# Altium PCB TimeCounter.PcbDoc
Units mil, origin at the board's own origin, x right, y up, seen from the top; angles counter-clockwise.
Board outline 2645.67 x 2677.01 mil, 4 copper layers (Top Layer, GND, PWR, Bottom Layer), stack 62.778 mil thick; 32 components, 21 nets, 141 pads, 58 vias.
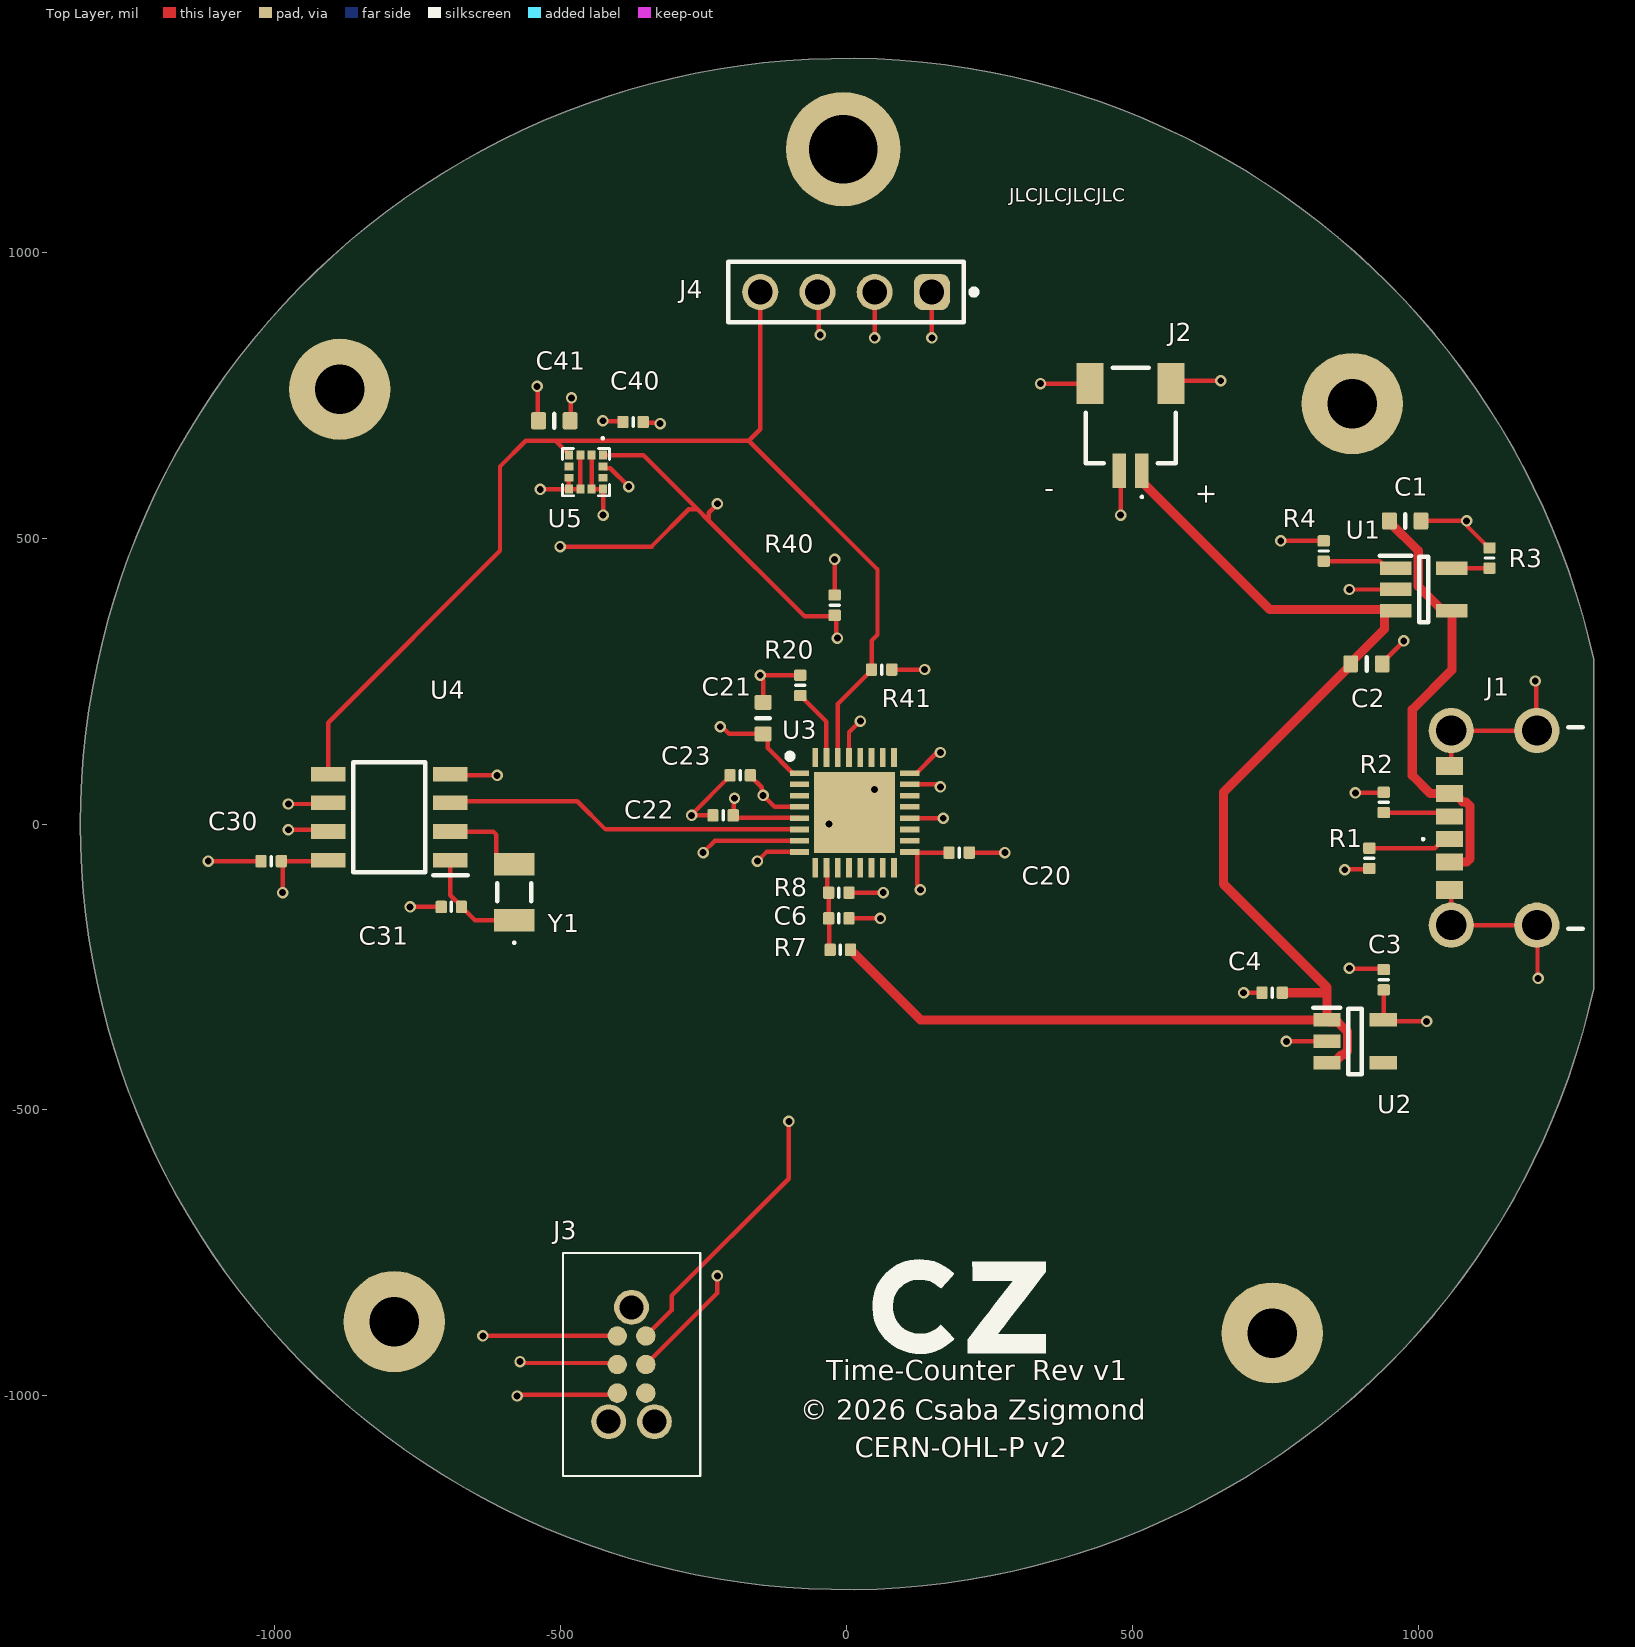
[diagram p0: Top Layer view]
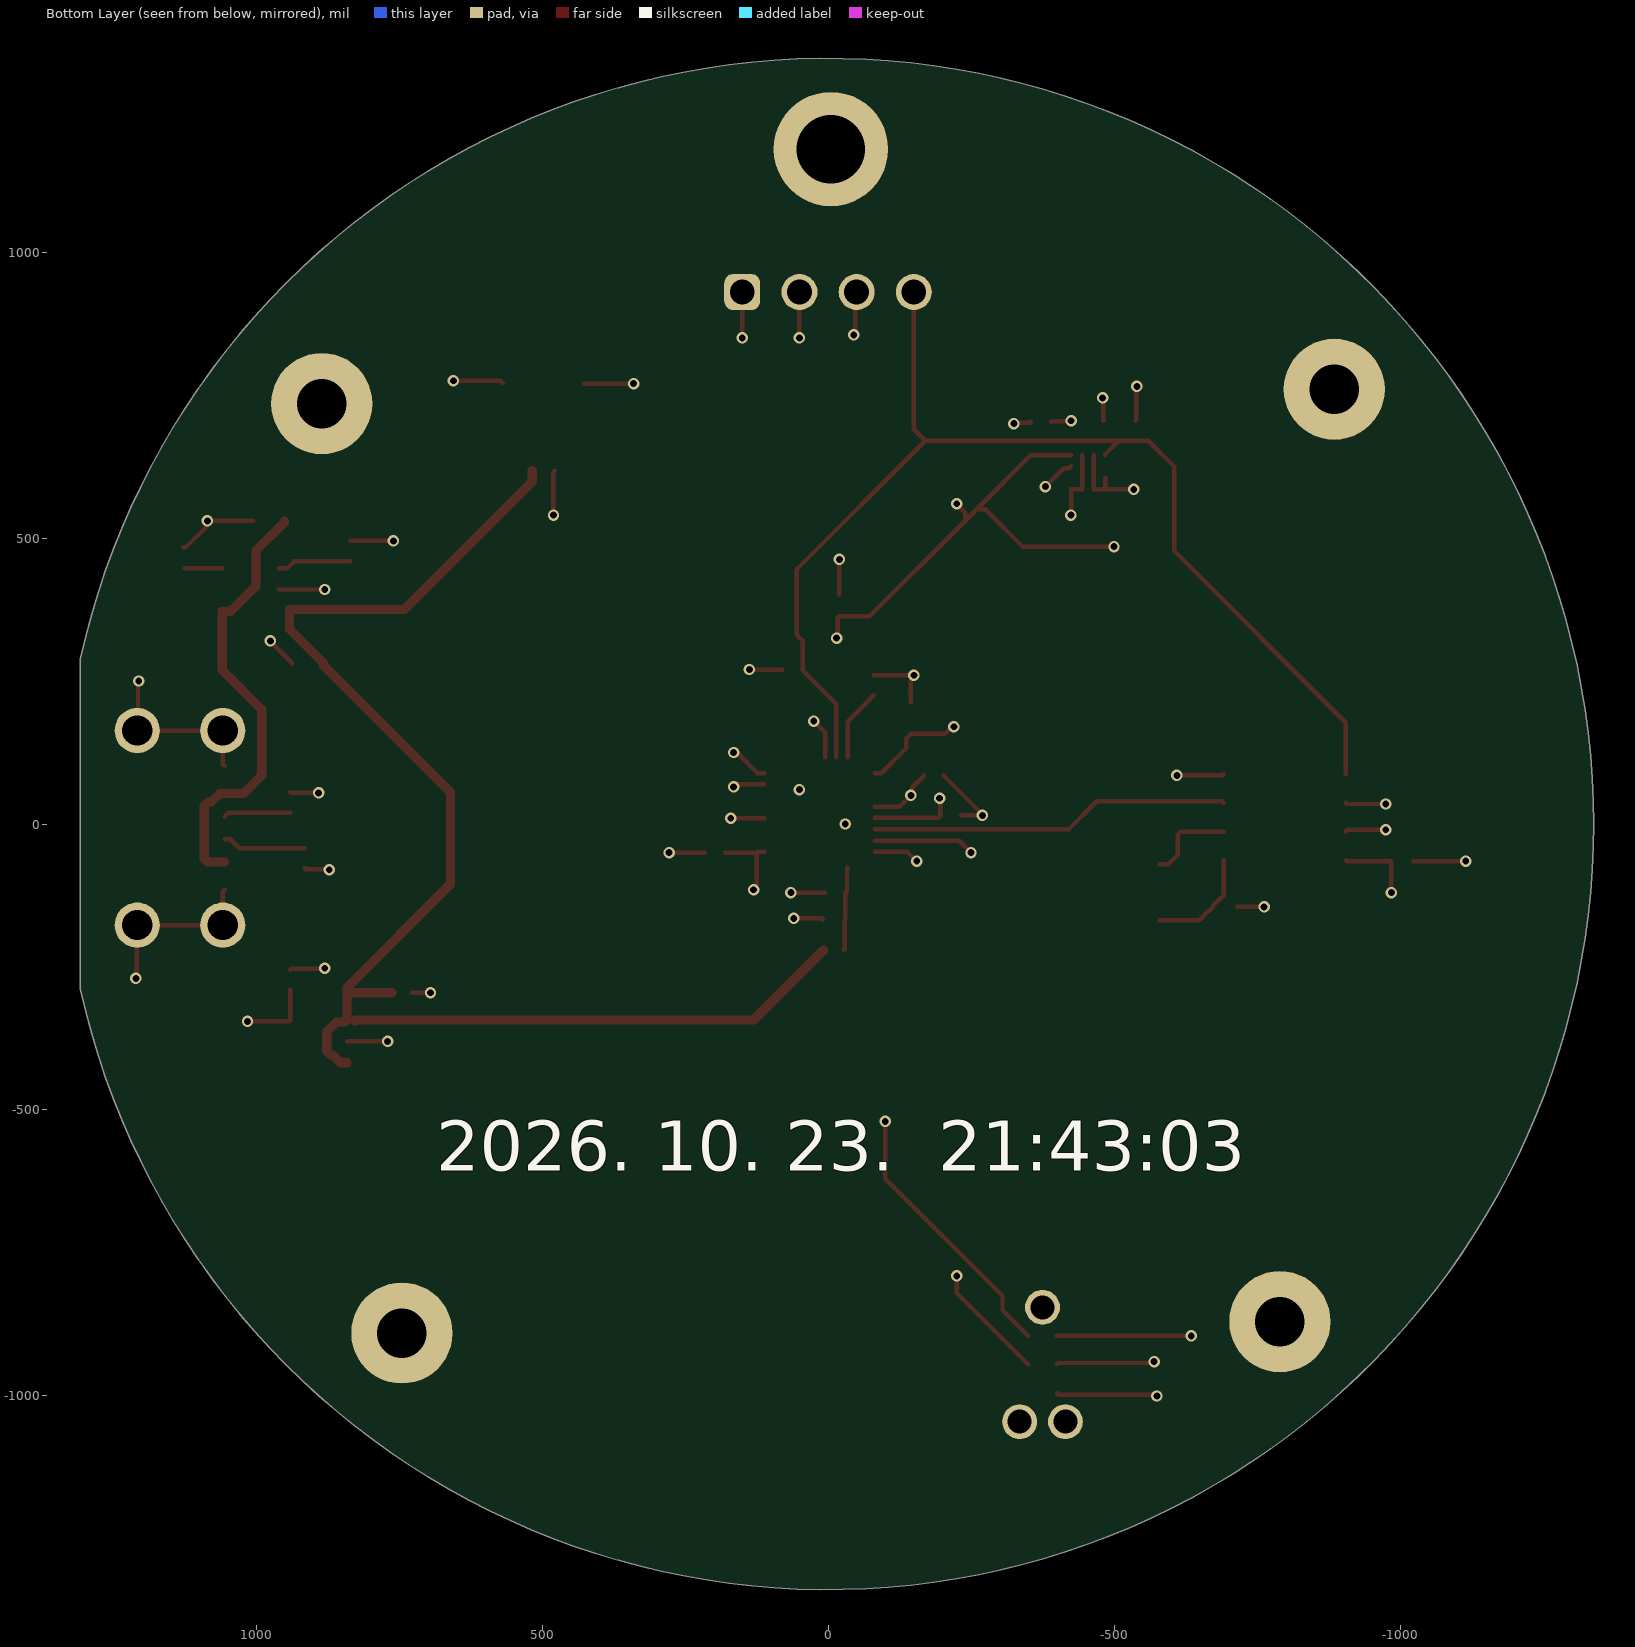
[diagram p1: Bottom Layer view, seen from below]
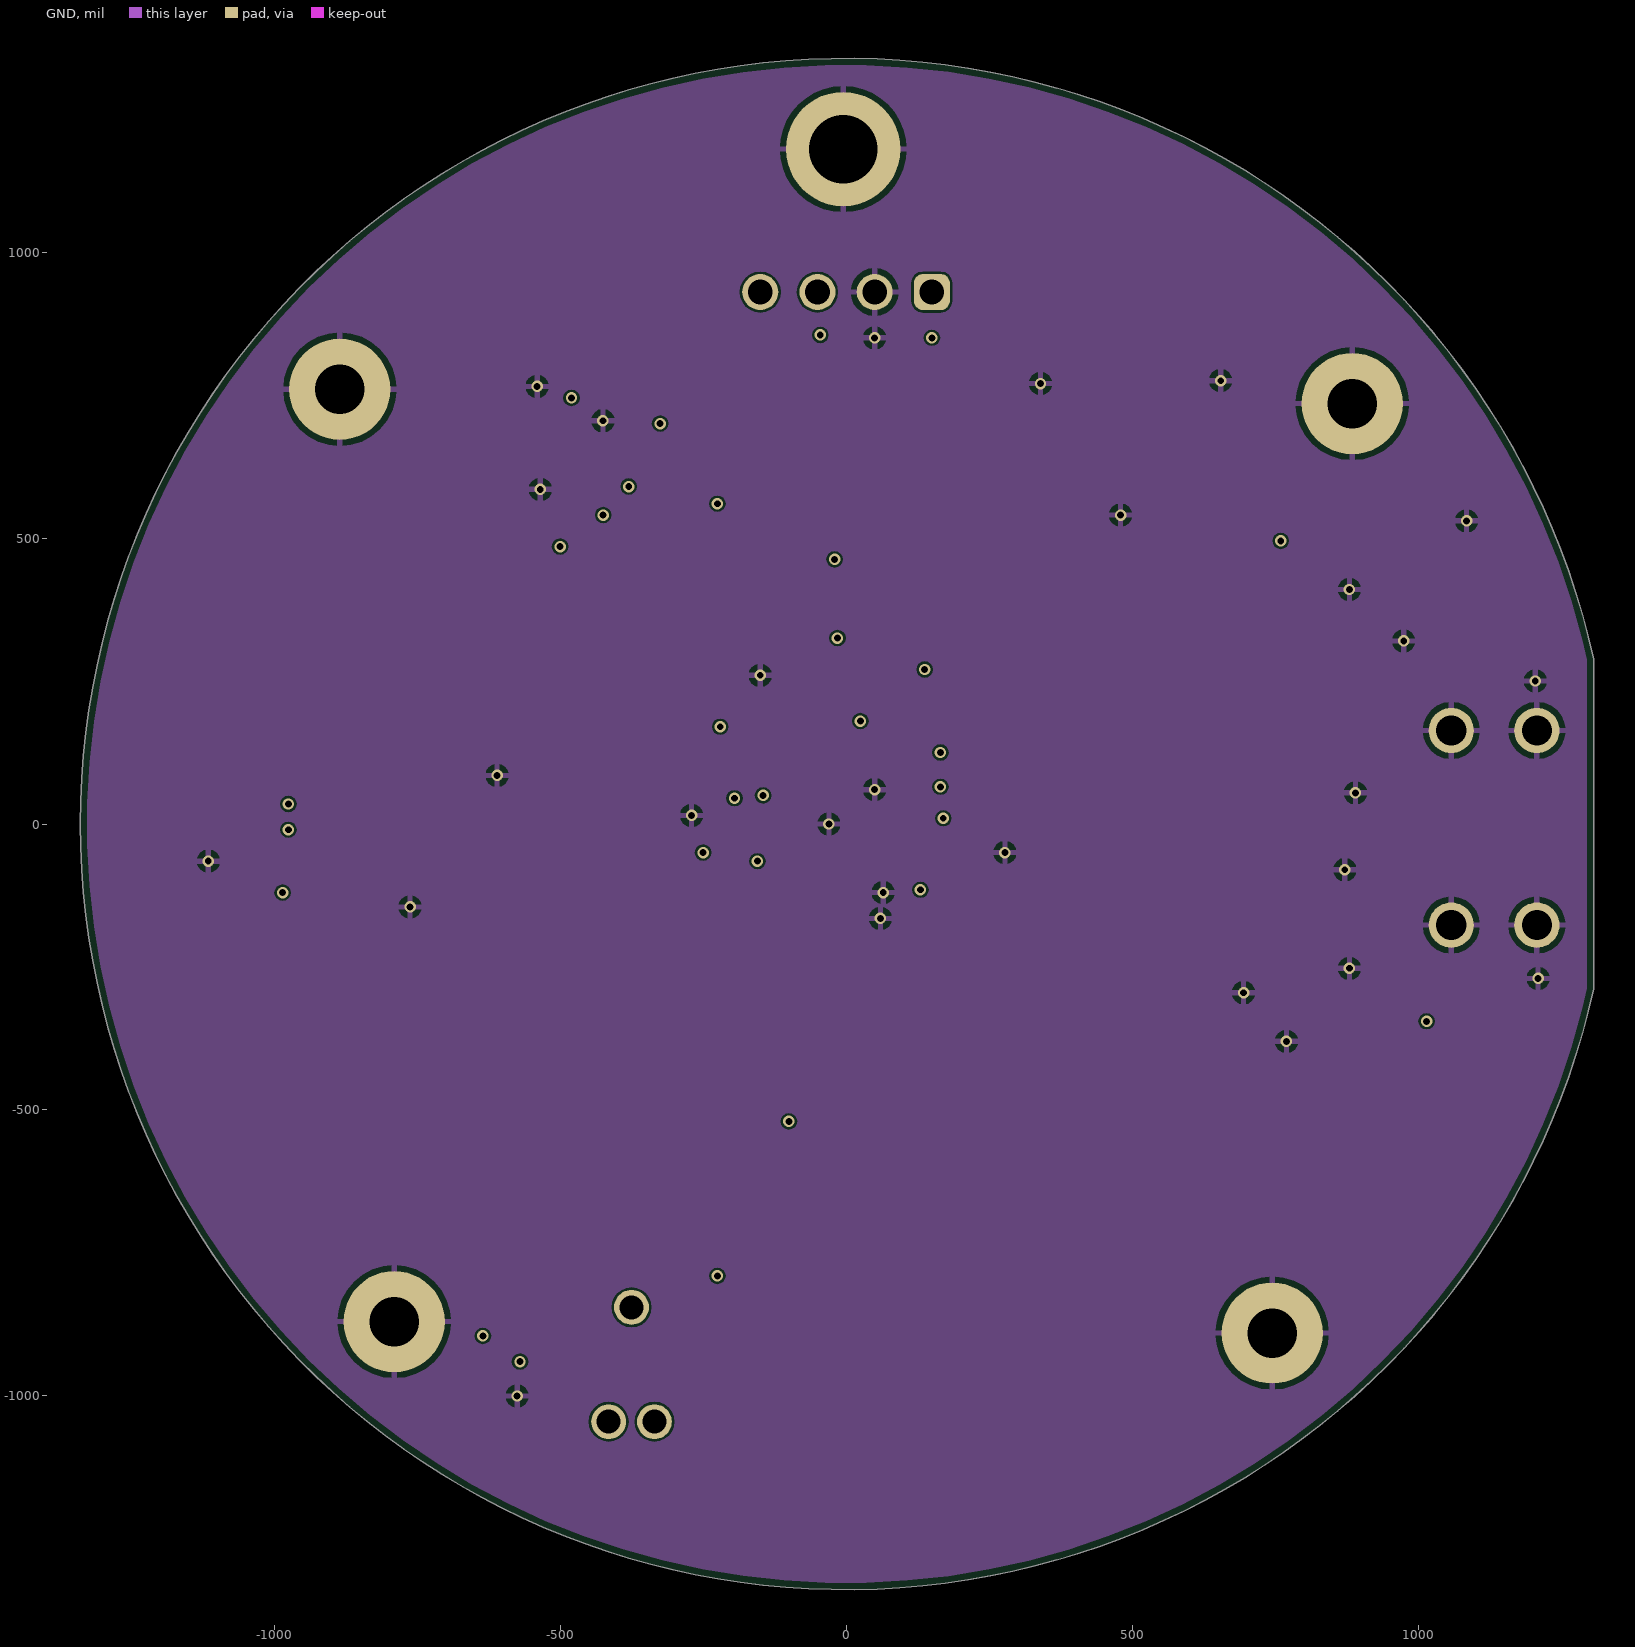
[diagram p2: GND]
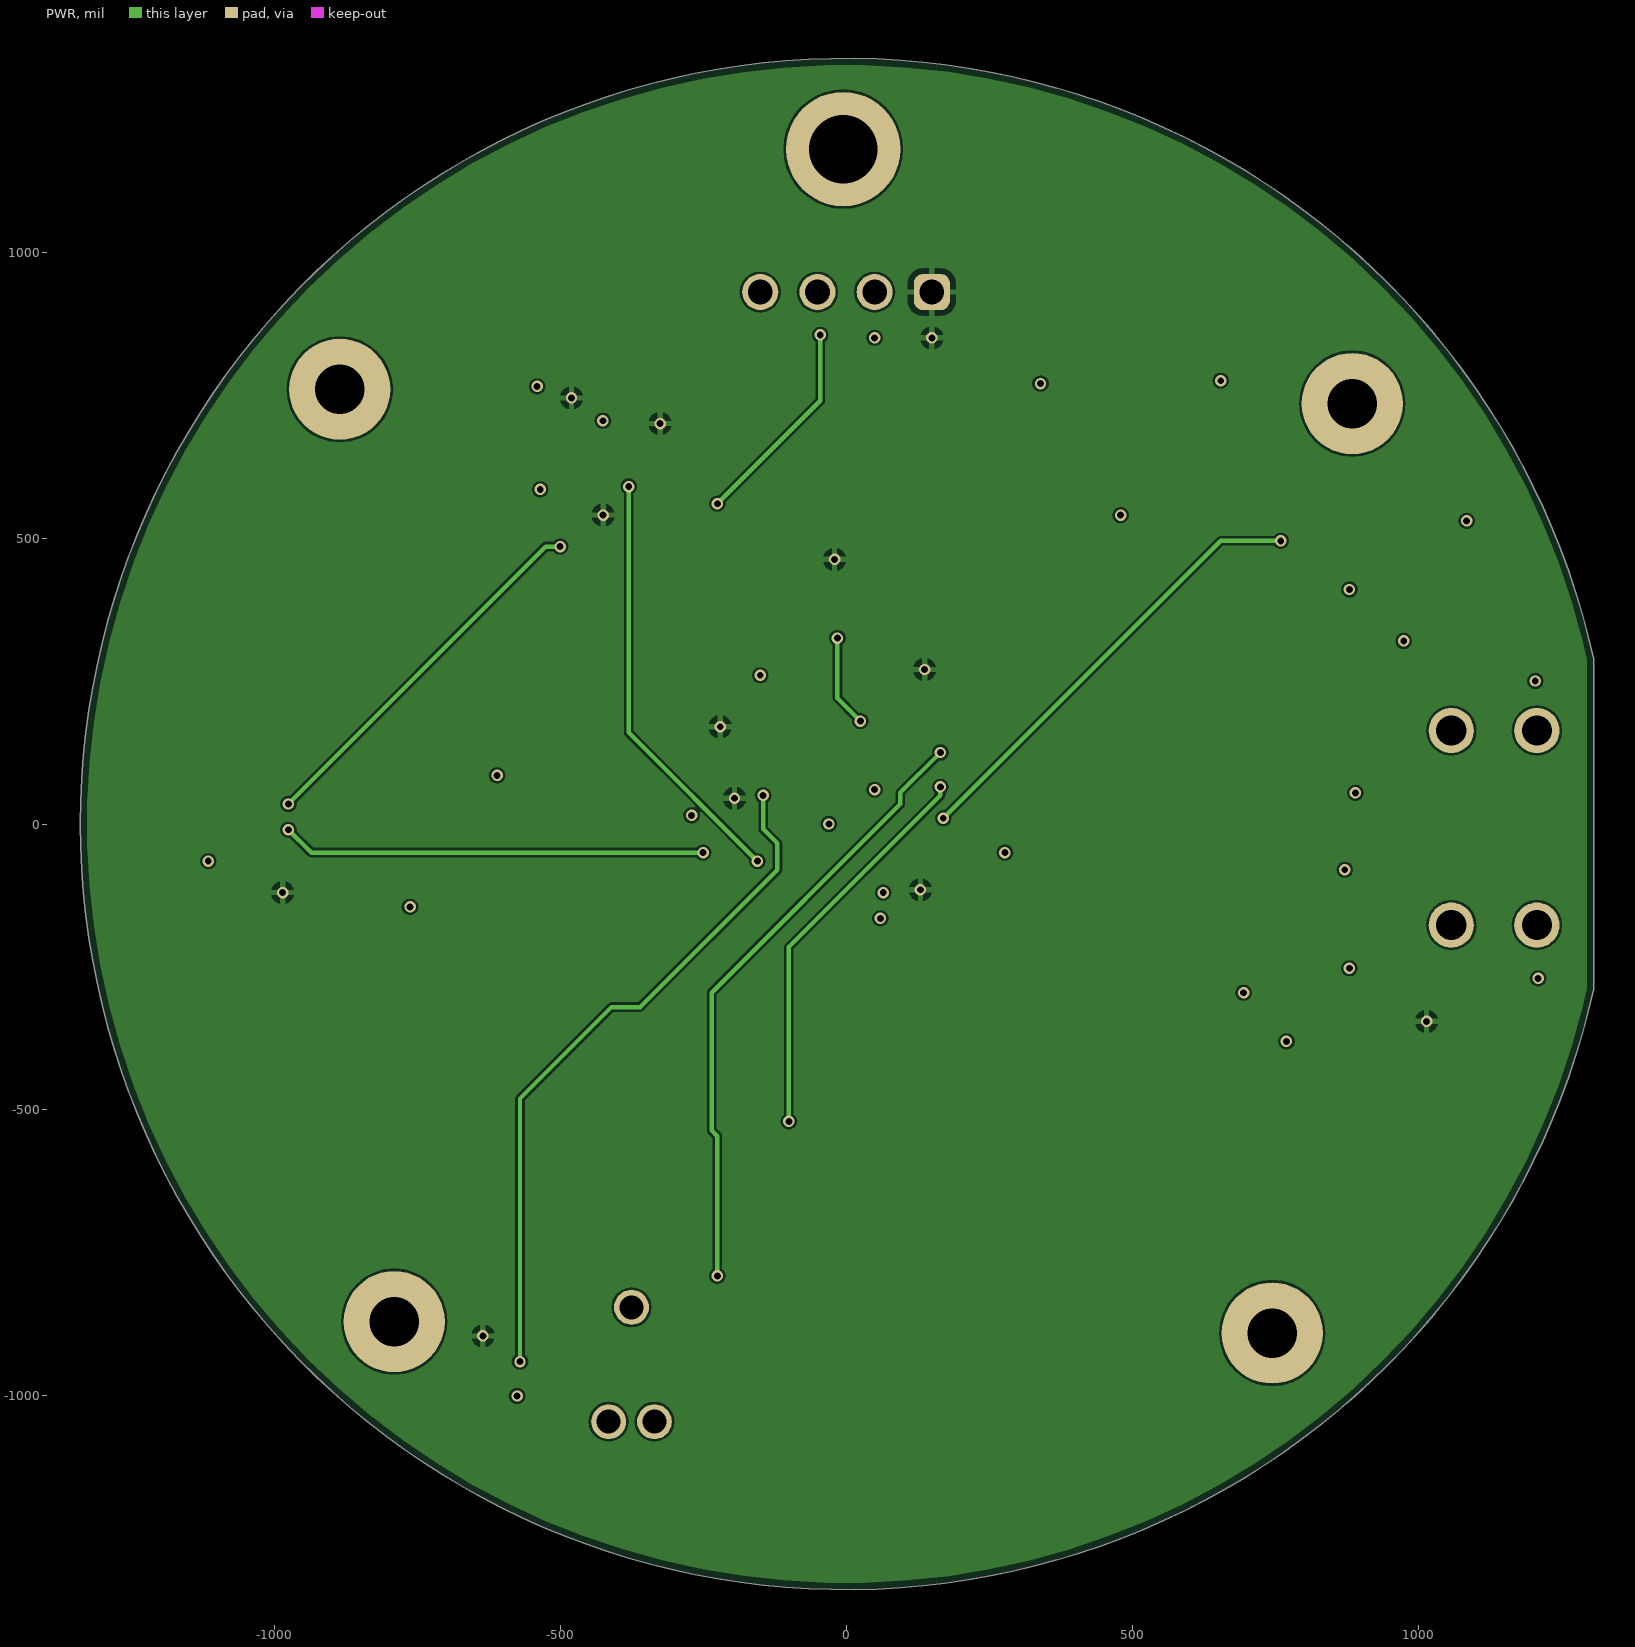
[diagram p3: PWR]

## Layer stack, top to bottom
Top Solder: solder mask 0.4, Solder Resist, Dk 3.5
Top Layer: signal copper 1.4
Dielectric 2: prepreg 8.3, PP-006, Dk 4.1
GND: signal copper 0.689
Dielectric 1: dielectric 42, FR-4, Dk 4.8
PWR: signal copper 0.689
Dielectric 3: prepreg 8.3, PP-006, Dk 4.1
Bottom Layer: signal copper 1.4
Bottom Solder: solder mask 0.4, Solder Resist, Dk 3.5

## Board outline
1307.09,-288.67 cw(c0,0) 1307.09,288.67 1307.09,288.66

## Design rules (kind name [scope] priority, off if disabled: settings)
BoardOutlineClearance [All] p1: gap=12 ignorepadtopadclearanceinfootprint=FALSE
Clearance [All] p1: gap=4 ignorepadtopadclearanceinfootprint=FALSE
ComponentClearance [All] p1: gap=8 collisioncheckmode=3 verticalgap=10 showdistances=FALSE
HoleSize [All] p1: absolutevalues=TRUE maxlimit=248 minlimit=8 maxpercent=80.000 minpercent=20.000
MinimumSolderMaskSliver [All] p1: minsoldermaskwidth=4
PolygonConnect [All] p1: connectstyle=Relief reliefconductorwidth=10 reliefentries=4 polygonreliefangle="90 Angle" airgapwidth=10
RoutingLayers [All] p1: top layer_v5=TRUE mid layer 1_v5=FALSE mid layer 2_v5=TRUE bottom layer_v5=FALSE
RoutingVias [All] p1: holewidth=12 width=20 viastyle="Through Hole" minholewidth=12 minwidth=20 maxholewidth=28 maxwidth=50
SilkToSilkClearance [All] p1: silktosilkclearance=6
SilkToSolderMaskClearance [IsText Or IsRegion] p1: minsilkscreentomaskgap=10 clearancetoexposedcopper=FALSE
SolderMaskExpansion [All] p1: expansion=0 istentingtop=FALSE
SupplyNets "Schematic Supply Nets_3" [InNet('3V3')] p1: voltage=0.000
SupplyNets "Schematic Supply Nets_2" [InNet('VBUS')] p2: voltage=0.000
SupplyNets "Schematic Supply Nets_1" [InNet('VBAT')] p3: voltage=0.000
SupplyNets "Schematic Supply Nets" [InNet('GND')] p4: voltage=0.000
Width Power [InNet('VBUS') Or InNet('VBAT')] p1: maxlimit=40 minlimit=8 preferedwidth=16
Width [All] p2: maxlimit=39 minlimit=4 preferedwidth=7.8
24 further rules are at their usual default settings.

## Components (designator, comment, footprint, x,y, rotation, side; value= is the part's Value field where it differs from the comment)
C1 "Capacitor 4.7µF +/-20% 10V 0603" CAPC0603(1608)100_L 977.56,530 r0 top value=4.7µF
C2 "Capacitor 4.7µF +/-20% 10V 0603" CAPC0603(1608)100_L 910,280 r0 top value=4.7µF
C3 "Capacitor 1µF +/-20% 10V 0402" CAPC0402(1005)60_L 940,-272.28 r90 top value=1µF
C4 "Capacitor 1µF +/-20% 10V 0402" CAPC0402(1005)60_L 745,-295 r180 top value=1µF
C6 "Capacitor 100nF +/-20% 10V 0402" CAPC0402(1005)60_L -12.72,-165 r0 top value=100nF
C20 "Capacitor 100nF +/-20% 10V 0402" CAPC0402(1005)60_L 197.72,-50 r0 top value=100nF
C21 "Capacitor 4.7µF +/-20% 10V 0603" CAPC0603(1608)100_L -145,185 r90 top value=4.7µF
C22 "Capacitor 100nF +/-20% 10V 0402" CAPC0402(1005)60_L -215,15 r180 top value=100nF
C23 "Capacitor 100nF +/-20% 10V 0402" CAPC0402(1005)60_L -185,85 r180 top value=100nF
C30 "Capacitor 100nF +/-20% 10V 0402" CAPC0402(1005)60_L -1005,-65 r180 top value=100nF
C31 "20pF 50V C0G 0402" CAPC0402(1005)60_L -690,-145 r180 top value="20pf C0G"
C40 "Capacitor 100nF +/-20% 10V 0402" CAPC0402(1005)60_L -372.36,702.86 r180 top value=100nF
C41 "Capacitor 10µF +/-20% 10V 0603" CAPC0603(1608)100_L -510,705 r180 top value=10µF
J1 "USB4125-GF-A-0190" USB4125GFA0190 1176.26,-6.73 r90 top
J2 "SM02B-SRSS_TB__LF__SN_" SM02BSRSSTBLFSN 497.48,707.64 r180 top
J3 "TC2030-IDC-NL" TC2030IDCNL -375,-945 r270 top
J4 "61300411121" 61300411121 0,930 r180 top
R1 "5D6KR2J" RESC0402(1005)_L 915,-60 r270 top value=5.6k
R2 "5D6KR2J" RESC0402(1005)_L 940,37.72 r90 top value=5.6k
R3 "10KR2F" RESC0402(1005)_L 1125,465 r90 top value=10k
R4 "10KR2F" RESC0402(1005)_L 835,477.28 r90 top value=10k
R7 "Resistor 1M +/-1 % 0402 63 mW" RESC0402(1005)_L -10,-220 r180 top value=1M
R8 "Resistor 1M +/-1 % 0402 63 mW" RESC0402(1005)_L -12.72,-120 r0 top value=1M
R20 "10KR2F" RESC0402(1005)_L -80,242.28 r90 top value=10k
R40 "4D7KR2F" RESC0402(1005)_L -20,382.72 r90 top value=4.7k
R41 "4D7KR2F" RESC0402(1005)_L 62.28,270 r180 top value=4.7k
U1 "MCP73831T-2ACI_OT" SOT95P270X145-5N 1010,410 r0 top
U2 "TPS7A0233DBVR" SOT95P280X145-5N 890,-380 r0 top
U3 "STM32L031K6U6" QFN50P500X500X60-33N-D 15,20 r0 top
U4 "BM8563ESA" SOIC127P600X175-8N -798.62,11.85 r180 top
U5 "LIS2DW12TR" LGA12R50P4X4_200X200X70 -454.68,615.24 r270 top
Y1 "Q13FC13500004" Q13FC13500004FC13532768KHZ125PF -580,-119.21 r90 top

## Footprints (in the part's own frame and the unit in brackets; to place one, negate y for a bottom-side part, rotate by r counter-clockwise, add the part's x,y. Pads: shape width x height; smd on the part's side, far side on the other; paste and mask are expansions set on the pad)
61300411121 [mm] "Pin Header, pitch 2.54 mm, THT, Vertical, single row, 4p"
  rrect50% 1.6x1.6 hole 1.1: 1(-3.81,0)
  round 1.6 hole 1.1: 2(-1.27,0) 3(1.27,0) 4(3.81,0)
  silkscreen extent -5.8,-1.35 5.23,1.35, body extent -5.08,-1.27 5.08,1.27, height 8.57
CAPC0402(1005)60_L [mm] "Chip Capacitor, Body 1.0x0.5mm, Height 0.6mm, IPC High Density"
  rrect25% 0.5x0.55 smd: 1(-0.45,0) 2(0.45,0)
  silkscreen extent 0,-0.2 0,0.2, body extent -0.5,-0.25 0.5,0.25, height 0.6
CAPC0603(1608)100_L [mm] "Chip Capacitor, Body 1.6x0.8mm, Height 1.0mm, IPC High Density"
  rrect25% 0.66x0.76 smd: 1(-0.7,0) 2(0.7,0)
  silkscreen extent 0,-0.3 0,0.3, body extent -0.8,-0.4 0.8,0.4, height 0.95
LGA12R50P4X4_200X200X70 [mm]
  rect 0.4x0.35 smd: 1(-0.76,0.75) 2(-0.76,0.25) 3(-0.76,-0.25) 4(-0.76,-0.75) 7(0.76,-0.75) 8(0.76,-0.25) 9(0.76,0.25) 10(0.76,0.75)
  rect 0.35x0.4 smd: 5(-0.25,-0.76) 6(0.25,-0.76) 11(0.25,0.76) 12(-0.25,0.76)
  silkscreen extent -1.55,-1.05 1.05,1.05
Q13FC13500004FC13532768KHZ125PF [mm]
  rect 1x1.8 smd: 1(-1.25,0) 2(1.25,0)
  silkscreen extent -2.3,-0.75 0.4,0.75
QFN50P500X500X60-33N-D [mm]
  rect 0.85x0.25 smd: 1(-2.45,1.75) 2(-2.45,1.25) 3(-2.45,0.75) 4(-2.45,0.25) 5(-2.45,-0.25) 6(-2.45,-0.75) 7(-2.45,-1.25) 8(-2.45,-1.75) 17(2.45,-1.75) 18(2.45,-1.25) 19(2.45,-0.75) 20(2.45,-0.25) 21(2.45,0.25) 22(2.45,0.75) 23(2.45,1.25) 24(2.45,1.75)
  rect 0.25x0.85 smd: 9(-1.75,-2.45) 10(-1.25,-2.45) 11(-0.75,-2.45) 12(-0.25,-2.45) 13(0.25,-2.45) 14(0.75,-2.45) 15(1.25,-2.45) 16(1.75,-2.45) 25(1.75,2.45) 26(1.25,2.45) 27(0.75,2.45) 28(0.25,2.45) 29(-0.25,2.45) 30(-0.75,2.45) 31(-1.25,2.45) 32(-1.75,2.45)
  rect 3.6x3.6 smd: 33(0,0)
  silkscreen extent -3,2.38 -2.75,2.62, body extent -2.55,-2.55 2.55,2.55, height 0.6
RESC0402(1005)_L [mm] "Chip Resistor, Body 1.0x0.5mm, IPC High Density"
  rrect25% 0.5x0.55 smd: 1(-0.45,0) 2(0.45,0)
  silkscreen extent 0,-0.2 0,0.2, body extent -0.5,-0.25 0.5,0.25, height 0.3
SM02BSRSSTBLFSN [mm]
  rect 0.6x1.55 smd: 1(-0.5,2.288) 2(0.5,2.288)
  rect 1.2x1.8 smd: MP1(-1.8,-1.587) MP2(1.8,-1.587)
  silkscreen extent -2,-2.29 2,3.5, body extent -2,-2.19 2,2.76, height 2.97
SOIC127P600X175-8N [mm]
  rect 1.525x0.65 smd: 1(-2.712,1.905) 2(-2.712,0.635) 3(-2.712,-0.635) 4(-2.712,-1.905) 5(2.712,-1.905) 6(2.712,-0.635) 7(2.712,0.635) 8(2.712,1.905)
  silkscreen extent -3.47,-2.45 1.6,2.58, body extent -3,-2.45 3,2.45, height 1.75
SOT95P270X145-5N [mm]
  rect 1.4x0.6 smd: 1(-1.25,0.95) 2(-1.25,0) 3(-1.25,-0.95) 4(1.25,-0.95) 5(1.25,0.95)
  silkscreen extent -1.95,-1.45 0.2,1.5, body extent -1.35,-1.45 1.35,1.45, height 1.45
SOT95P280X145-5N [mm]
  rect 1.2x0.6 smd: 1(-1.25,0.95) 2(-1.25,0) 3(-1.25,-0.95) 4(1.25,-0.95) 5(1.25,0.95)
  silkscreen extent -1.85,-1.45 0.3,1.5
TC2030IDCNL [mm]
  round 0.863 smd paste-2539.97: 1(-1.27,-0.635) 2(-1.27,0.635) 3(0,-0.635) 4(0,0.635) 5(1.27,-0.635) 6(1.27,0.635)
  round 1.55 hole 1.067: 7(-2.54,0) 8(2.54,-1.016) 9(2.54,1.016)
  silkscreen extent -4.95,-3.05 4.95,3.05, body extent -4.95,-3.05 4.95,3.05, height 18.77
USB4125GFA0190 [mm]
  rect 0.7x1.2 smd: A5(-0.5,3.08) B5(0.5,3.08)
  rect 0.76x1.2 smd: A9(1.52,3.08) B9(-1.52,3.08)
  rect 0.8x1.2 smd: A12(2.75,3.08) B12(-2.75,3.08)
  round 2.01 hole 1.34: MH1(-4.32,3) MH2(-4.32,-0.8) MH3(4.32,-0.8) MH4(4.32,3)
  silkscreen extent -4.47,-2.84 4.47,4.3, body extent -4.47,-3.45 4.47,3.45, height 3.26

## Part data
C1 C2 C21: library part CMP-001-00076-4, "Chip Capacitor, 4.7µF +/-20%, 10V, 0603, Thickness 1 mm", Case/Package=0603, Max Operating Temperature=85°C, Min Operating Temperature=-55°C, Tolerance=10%, Voltage Rating=10V, Mounting Technology=SMT, Pins=2
C3 C4: library part CMP-001-00063-3, "Chip Capacitor, 1µF +/-20%, 10V, 0402, Thickness 0.6 mm", Case/Package=0402, Max Operating Temperature=85°C, Min Operating Temperature=-55°C, Tolerance=10%, Voltage Rating=10V, Mounting Technology=SMT, Pins=2
C6 C20 C22 C23 C30 C40: library part CMP-001-00061-3, "Chip Capacitor, 100nF +/-20%, 10V, 0402, Thickness 0.6 mm", Case/Package=0402, Max Operating Temperature=85°C, Min Operating Temperature=-55°C, Tolerance=20%, Voltage Rating=10V, Mounting Technology=SMT, Pins=2
C31: library part CMP-001-00061-3, Case/Package=0402, Max Operating Temperature=85°C, Min Operating Temperature=-55°C, Tolerance=20%, Voltage Rating=10V, Mounting Technology=SMT, Pins=2
C41: library part CMP-001-00075-4, "Chip Capacitor, 10µF +/-20%, 10V, 0603, Thickness 1 mm", Case/Package=0603, Max Operating Temperature=85°C, Min Operating Temperature=-55°C, Tolerance=10%, Voltage Rating=10V, Mounting Technology=SMT, Pins=2
J1: "Connector", Manufacturer_Name="GCT (GLOBAL CONNECTOR TECHNOLOGY)", Mouser Part Number=640-USB4125-GF-A-190, Datasheet Link=https://eu.mouser.com/datasheet/2/837/usb4125-2448699.pdf, Manufacturer_Part_Number=USB4125-GF-A-0190, Mouser Price/Stock=https://www.mouser.co.uk/ProductDetail/GCT/USB4125-GF-A-0190?qs=QNEnbhJQKvbCz4hEJBS24w%3D%3D
J2: library part SM02B-SRSS-TB__LF__SN_, "Connector", Manufacturer_Name="JST (JAPAN SOLDERLESS TERMINALS)", Manufacturer_Part_Number="SM02B-SRSS-TB (LF)(SN)", Datasheet Link=https://www.jst-mfg.com/product/pdf/eng/eSH.pdf, Height=2.9mm
J3: "Connector", Manufacturer_Name="Tag Connect", Height=18.669mm, Manufacturer_Part_Number=TC2030-IDC-NL
J4: library part CMP-1502-01064-4, "THT Vertical Pin Header WR-PHD, Pitch 2.54 mm, Single Row, 4 pins", Color=Black, Contact Resistance=20mΩ, Current Rating=3A, Max Operating Temperature=105°C, Min Operating Temperature=-40°C, Operating Supply Voltage=250V, Connector Type="Male Pin", Contact Material=Gold, Contact Mating Length=5.9944mm, Contact Plating=Gold, Gender=Male, Height=8.89mm, Lead Free="Lead Free", Lead Pitch=2.54mm, Mount="Through Hole", Number of Contacts=4, Number of Pins=4, Number of Positions=4, Number of Rows=1, Orientation=Vertical, Packaging=Bulk, Pitch=2.54mm, RoHS=Compliant, Termination=Solder, Voltage Rating=250V
R1 R2: library part CMP-009-00108-2, "5K6 0.063W 5% 0402 (1005 Metric)  SMD", Case/Package=0402, Power=63mW, Tolerance=5%, Mounting Technology=SMT, Pins=2
R3 R4 R20: library part CMP-009-00066-2, "10K 0.063W 1% 0402 (1005 Metric)  SMD", Case/Package=0402, Power=63mW, Tolerance=1%, Mounting Technology=SMT, Pins=2
R7 R8: library part CMP-009-00165-3, "Chip Resistor, 1 MOhms, +/-1 %, 63 mW, -55 to 155 degC, 0402", Case/Package=0402, Power=63mW, Tolerance=1%, Pins=2
R40 R41: library part CMP-009-00105-2, "4K7 0.063W 1% 0402 (1005 Metric)  SMD", Case/Package=0402, Power=63mW, Tolerance=1%, Mounting Technology=SMT, Pins=2
U1: "Integrated Circuit", Arrow Part Number=MCP73831T-2ACI/OT, Manufacturer_Name=Microchip, Mouser Part Number=579-MCP73831T-2ACIOT, Arrow Price/Stock=https://www.arrow.com/en/products/mcp73831t-2aci-ot/microchip-technology.html?utm_currency=USD&region=nac, Datasheet Link=http://ww1.microchip.com/downloads/en/DeviceDoc/20001984g.pdf, Height=1.45mm, Manufacturer_Part_Number=MCP73831T-2ACI/OT, Mouser Price/Stock=https://www.mouser.co.uk/ProductDetail/Microchip-Technology/MCP73831T-2ACI-OT?qs=yUQqVecv4qvbBQBGbHx0Mw%3D%3D
U2: "Integrated Circuit", Manufacturer_Name="Texas Instruments", Mouser Part Number=595-TPS7A0233DBVR, Arrow Part Number=TPS7A0233DBVR, Arrow Price/Stock=https://www.arrow.com/en/products/tps7a0233dbvr/texas-instruments.html?utm_currency=USD&region=nac, Datasheet Link=https://www.ti.com/lit/gpn/tps7a02, Height=1.45mm, Manufacturer_Part_Number=TPS7A0233DBVR, Mouser Price/Stock=https://www.mouser.co.uk/ProductDetail/Texas-Instruments/TPS7A0233DBVR?qs=QNEnbhJQKvZidySW4FDctA%3D%3D
U3: "Integrated Circuit", Manufacturer_Name=STMicroelectronics, Mouser Part Number=511-STM32L031K6U6, Arrow Part Number=STM32L031K6U6, Arrow Price/Stock=https://www.arrow.com/en/products/stm32l031k6u6/stmicroelectronics?utm_currency=USD&region=nac, Datasheet Link=https://www.st.com/resource/en/datasheet/stm32l031g4.pdf, Height=0.6mm, Manufacturer_Part_Number=STM32L031K6U6, Mouser Price/Stock=https://www.mouser.co.uk/ProductDetail/STMicroelectronics/STM32L031K6U6?qs=U58vgkJzipQU%2FBNiv87OVQ%3D%3D
U4: library part PCF8563T, "Integrated Circuit", Manufacturer_Name=NXP, Mouser Part Number=N/A, Datasheet Link=https://www.nxp.com/docs/en/data-sheet/PCF8563.pdf, Height=1.75mm, Manufacturer_Part_Number=BM8563ESA, Mouser Price/Stock=https://www.mouser.co.uk/ProductDetail/NXP-Semiconductors/PCF8563T?qs=F5EMLAvA7IDH70aFPvsqMw%3D%3D
U5: "Accelerometer X, Y, Z Axis Â±2g, 4g, 8g, 16g 400Hz 12-LGA _2x2_", Package="LGA-12 STMicroelectronics", Availability=Unavailable, MF=STMicroelectronics, MP=LIS2DW12TR, Price=None, SnapEDA_Link=https://www.snapeda.com/parts/LIS2DW12TR/STMicroelectronics/view-part/621283/?ref=snap
Y1: library part Q13FC13500004_FC-135_32.768KHZ_12.5PF, "Crystal or Oscillator", Manufacturer_Name="Epson Timing", Manufacturer_Part_Number="Q13FC13500004 FC-135 32.768KHZ 12.5PF", Datasheet Link=https://support.epson.biz/td/api/doc_check.php?mode=dl&lang=en&Parts=FC-135, Height=0.9mm

## Free pads (board coordinates)
  round 177 hole 86.6: H1(745,-890) H2(-790,-870) H3(-885,760) H4(885,735)
  round 200 hole 120: K1(-5,1180)

## Via types
v1: diameter 20, hole 12, Top Layer to Bottom Layer, tented both sides, 58 vias

## Nets (pads, with @x,y where several pads share a name; then routed paths per layer and width w, separated by ;. In a path a pad name is that pad's centre, name@x,y a point inside that pad or via, vN(x,y) a via of type N, cw(c..) or ccw(c..) an arc to the next point about the centre after c; other vN are vias at no path point)
3V3: C3.1 C20.1 C21.1 C22.1 C30.1 C40.1 C41.1 J3.1 J4.1 R40.2 R41.1 U2.5 U3.1 U3.5 U3.17 U4.8 U5.2 U5.9 U5.10 | length 1363.7
  Top Layer w7.8: v1(-985,-120) -985,-65 -907.24,-65 U4.8 ; v1(-635,-895) J3.1 ; C41.1 -481.22,706.22 -481.22,743.78 v1(-480,745) ; U5.2 U5.9 U5.10 -424.88,585.04 -424.88,540.35 v1(-424.61,540.08) ; C40.1@-354.82,703.04 -353.21,701.43 -326.43,701.43 v1(-325,700) ; v1(-220,170) -216.7,170 -204.14,157.44 C21.1@-146.96,157.44 ; v1(-195,45) -196.14,43.86 -196.14,16.14 C22.1 -193.46,11.18 -82.48,11.18 U3.5 ; C21.1 -137.11,149.55 -137.11,132.74 -93.27,88.9 U3.1 ; R40.2 v1(-20,462.72) ; R41.1 80.08,270.08 137.4,270.08 v1(137.48,270.16) ; U3.17 U3.17@123.27,-48.9 ; v1(130,-115) 130,-111.7 124.29,-105.99 124.29,-49.92 U3.17@123.27,-48.9 ; v1(150,850) J4.1 ; C20.1 124.37,-50 U3.17@123.27,-48.9 ; C3.1 940,-341.81 U2.5 941.61,-345 v1(1015,-345)
CHG_STAT: R4.2 U3.20 | length 924.5
  Top Layer w7.8: U3.20 111.54,10.08 169.92,10.08 v1(170,10) ; v1(760,495) R4.2
  PWR w7.8: v1(170,10) 655,495 v1(760,495)
GND: C1.2 C2.2 C3.2 C4.2 C6.2 C20.2 C21.2 C22.2 C23.2 C30.2 C31.2 C40.2 C41.2 J1.A12 J1.B12 J1.MH1 J1.MH2 J1.MH3 J1.MH4 J2.2 J2.MP1 J2.MP2 J3.5 J4.2 pad.H1 pad.H2 pad.H3 pad.H4 pad.K1 R1.2 R2.2 R3.2 R8.2 R20.2 U1.2 U2.2 U3.33 U4.4 U5.3 U5.6 U5.7 U5.8 | length 2556.9
  Top Layer w7.8: v1(-1115,-65) C30.2 ; v1(-762.28,-145) C31.2@-715,-145 ; U4.4 -690,85 v1(-610,85) ; v1(-575,-1000) -572.67,-997.67 -402.67,-997.67 J3.5 ; v1(-540,765) -538.78,763.78 -538.78,706.22 C41.2 ; v1(-534.61,585.08) -534.49,585.2 -484.72,585.2 -484.41,585.51 -484.41,605.2 U5.6 ; U5.7 U5.8 U5.3 ; v1(-425,705) -423.93,703.93 -391.15,703.93 C40.2 ; C22.2 v1(-270,15) -270,16.73 -202.72,84.02 C23.2 ; C21.2 -145,251.7 -150,256.7 v1(-150,260) R20.2 ; R8.2 v1(65,-120) ; C6.2@8.9,-167.57 8.9,-167.04 10.94,-165 v1(60,-165) ; v1(50,850) J4.2 ; C20.2 v1(277.72,-50) ; v1(340,770) 426.5,770 J2.MP2 ; J2.2 480,615.35 v1(480,540) ; J2.MP1 573.23,775 v1(655,775) ; v1(695,-295) C4.2 ; v1(770,-380) U2.2 ; v1(872,-80) 873.14,-78.86 913.86,-78.86 R1.2 ; v1(880,-252.28) 881.14,-253.43 938.86,-253.43 C3.2 ; v1(880,410) U1.2 ; v1(890.56,54.44) 891.05,54.94 939.51,54.94 R2.2 ; C2.2 937.56,281.96 975,319.4 v1(975,320) ; C1.2 v1(1085,530) 1087.33,527.67 1087.33,519.4 1123.19,483.55 R3.2@1127.27,483.55 ; J1.B12 1058.15,-118.15 J1.MH1 J1.MH2 1208.88,-177.93 1208.88,-268.88 v1(1210,-270) ; J1.A12 1058.15,104.68 J1.MH4 J1.MH3 1206.38,164.72 1206.38,248.62 v1(1205,250)
  other v1: -30,0 50,60
NetC31_1: C31.1 U4.1 Y1.1 | length 192.5
  Top Layer w7.8: U4.1 -691.85,-124.45 -672.28,-144.02 C31.1 -672.28,-145.98 -666.34,-151.93 -665.36,-151.93 -648.86,-168.43 Y1.1
NetJ1_A5: J1.A5 R1.1 | length 146.6
  Top Layer w7.8: R1.1 1029.29,-42.28 1045.16,-26.42 J1.A5
NetJ1_B5: J1.B5 R2.1 | length 117.9
  Top Layer w7.8: R2.1 1047.95,20 J1.B5
NetR3_1: R3.1 U1.5 | length 65.8
  Top Layer w7.8: U1.5 1059.33,447.28 R3.1
NetR4_1: R4.1 U1.1 | length 130.8
  Top Layer w7.8: R4.1 932.87,459.57 945.04,447.4 U1.1
NetR20_1: R20.1 U3.31 | length 127.7
  Top Layer w7.8: R20.1 -79.02,224.57 -73.07,218.62 -73.07,217.64 -34.21,178.78 U3.31
NetU4_2: U4.2 Y1.2 | length 156.3
  Top Layer w7.8: U4.2 -616.85,-13.15 -611.53,-18.47 -611.53,-54.21 -595.75,-70 Y1.2
NRST: C23.1 J3.3 U3.4 | length 1504.2
  Top Layer w7.8: v1(-570,-940) -567.67,-942.33 -402.67,-942.33 J3.3 ; C23.1 -167.28,84.02 -147.33,64.07 -147.33,52.33 v1(-145,50) -124.92,29.92 -81.54,29.92 U3.4
  PWR w7.8: v1(-570,-940) -570,-480 -410.04,-320.04 -360.04,-320.04 -120,-80 -120,-33.91 -145,-8.91 v1(-145,50)
RTC_CLK: U3.7 U4.7 | length 989.6
  Top Layer w7.8: v1(-975,-10) -908.54,-10 U4.7 ; v1(-250,-50) -229.21,-29.21 U3.7
  PWR w7.8: v1(-975,-10) -935,-50 v1(-250,-50)
RTC_INT: U3.6 U4.3 | length 632.2
  Top Layer w7.8: U4.3 -688.7,40 -470,40 -420.47,-9.53 U3.6
SCL: J4.3 R40.1 U3.29 U4.6 U5.1 | length 2277.7
  Top Layer w7.8: v1(-975,35) -907.24,35 U4.6 ; v1(-500,485) -340,485 -274.77,550.23 -259.77,550.23 ; U5.1 -425,645 -354.55,645 -259.77,550.23 ; v1(-225,560) -225,558.86 -239.77,544.09 -239.77,530.23 ; J4.3 -47.33,927.33 -47.33,857.33 v1(-45,855) ; v1(-15,325) -17.33,327.33 -17.33,361.57 -18.73,362.96 -72.51,362.96 -239.77,530.23 ; U3.29 5.16,160.16 v1(25,180) ; -259.77,550.23 -239.77,530.23
  PWR w7.8: v1(-975,35) -525,485 v1(-500,485) ; v1(-225,560) -45,740 v1(-45,855) ; v1(-15,325) -15,220 v1(25,180)
SDA: J4.4 R41.2 U3.30 U4.5 U5.4 | length 2094.8
  Top Layer w7.8: U4.5 -905.39,177.15 -605,477.55 -605,625 -560,670 -508.07,670 ; U5.4 -484.21,646.14 -508.07,670 ; J4.4 -150,690 -170,670 ; U3.30 -14.53,209.92 44.57,269.02 R41.2 44.57,320.55 55,330.98 55,445 -170,670 ; -508.07,670 -170,670
SWCLK: J3.4 U3.24 | length 1360.1
  Top Layer w7.8: J3.4 -225,-820 v1(-225,-790) ; U3.24 123.27,88.9 157.04,122.67 162.67,122.67 v1(165,125)
  PWR w7.8: v1(-225,-790) -225,-545.85 -235,-535.85 -235,-295 95,35 95,55 v1(165,125)
SWDIO: J3.2 U3.23 | length 1228.6
  Top Layer w7.8: J3.2 -305,-850 -305,-825 -100,-620 v1(-100,-520) ; U3.23 157.49,69.21 161.7,65 v1(165,65)
  PWR w7.8: v1(-100,-520) -100,-215 164.96,49.96 v1(165,65) v1(165,65)
TAP_INT: U3.8 U5.12 | length 887.7
  Top Layer w7.8: U5.12 -421.77,622.09 -412.09,622.09 v1(-380,590) ; v1(-155,-65) -138.9,-48.9 U3.8
  PWR w7.8: v1(-380,590) -380,160 v1(-155,-65)
VBAT: C2.1 C4.1 J2.1 R7.1 U1.3 U2.1 U2.3 | length 2515.9
  Top Layer w16: R7.1 7.72,-220.98 9.56,-222.83 10.54,-222.83 130.31,-342.6 825.17,-342.6 U2.1@827.07,-344.5 ; J2.1 517.17,598.86 741.02,375 941.23,375 941.23,340.75 882.44,281.96 C2.1 882.44,278.04 660,55.6 660,-105 840.79,-285.79 840.79,-295 ; C4.1 840.79,-295 ; U2.3 852.6,-417.4 866.19,-403.81 869.38,-403.81 876.41,-396.78 876.41,-363.22 859.6,-346.41 844.6,-346.41 U2.1 840.79,-295
VBAT_SENSE: C6.1 R7.2 R8.1 U3.10 | length 146.2
  Top Layer w7.8: U3.10 -33.19,-77.48 -33.19,-117.24 R8.1 C6.1 -29.07,-166.36 -29.07,-218.64 R7.2
VBUS: C1.1 J1.A9 J1.B9 U1.4 | length 772.6
  Top Layer w16: C1.1 950,528.04 1000.35,477.69 1000.35,415.72 1044.18,371.89 U1.4@1050.2,371.89 ; J1.B9 1084.76,-66.57 1090.62,-60.72 1090.62,31.7 1083.59,38.73 1078.04,38.73 1063.66,53.11 J1.A9 1021.89,53.11 990,85 990,200 1059.21,269.21 U1.4
pads on no net: J3.6 J3.7 J3.8 J3.9 U2.4 U3.2 U3.3 U3.9 U3.11 U3.12 U3.13 U3.14 U3.15 U3.16 U3.18 U3.19 U3.21 U3.22 U3.25 U3.26 U3.27 U3.28 U3.32 U5.5 U5.11

## Polygon pours and split planes (outlines as drawn)
GND on GND "GND_Plane" (solid, remove dead copper, pour order 2): 1307.09,-288.67 cw(c0,0) 1307.09,288.67 1307.09,288.66
3V3 on PWR "PWR_Plane" (solid, remove dead copper, pour order 3): 1307.09,-288.67 cw(c0,0) 1307.09,288.67 1307.09,288.66

## Silkscreen, mask and mechanical layers (free items; w line width, h text height)
Top Overlay:
  region: 213.13,-925.55 349.36,-925.55 349.36,-892.06 307.3,-891.92 265.23,-891.77 269.36,-886.38 277.2,-876.16 283.77,-867.6 305.69,-839.31 313.07,-829.84 323.82,-815.97 335.41,-800.98 342.51,-791.87 347.52,-785.48 349.36,-783.06 349.36,-764.9 221.06,-764.9 221.21,-781.67 221.36,-798.43 256.45,-798.4 284.46,-798.53 291.12,-799.1 259.14,-840.77 250.88,-851.48 242.32,-862.47 233.27,-874.17 216.73,-895.83 213.13,-900.45
  region: 58.11,-887.24 62.4,-893.36 67.87,-899.7 73.91,-905.62 79.9,-910.46 89.46,-916.33 99.75,-920.99 110.41,-924.3 121.06,-926.12 130.45,-926.51 139.85,-925.89 148.88,-924.31 157.18,-921.82 166.04,-917.84 173.84,-913.47 180.75,-908.1 187.14,-902.36 189.36,-900.06 185.9,-896.49 181.23,-891.5 175.94,-885.81 169.14,-878.57 165.99,-875.61 163.6,-877.64 159.03,-881.43 152.98,-885.12 146.41,-888.22 140.27,-890.2 134.73,-890.97 128.3,-891.16 121.91,-890.78 116.52,-889.85 108.56,-887.01 101.44,-882.99 95.26,-877.9 90.09,-871.88 86.05,-865.05 83.21,-857.55 81.67,-849.49 81.53,-841.02 82.33,-834.6 83.84,-828.55 86.02,-822.89 88.86,-817.67 92.35,-812.91 96.44,-808.66 101.13,-804.94 106.39,-801.8 111.77,-799.36 117.01,-797.76 122.58,-796.89 128.96,-796.63 138.38,-797.37 146.85,-799.64 154.84,-803.65 162.84,-809.57 166.05,-812.03 185.08,-791.14 188.36,-787.07 188.73,-786.12 188.49,-785.48 182.53,-780.26 173.63,-773.78 164.25,-768.63 154.46,-764.84 144.33,-762.45 135.9,-761.43 127.57,-761.18 119.37,-761.66 111.37,-762.88 103.61,-764.82 96.12,-767.48 88.96,-770.84 82.17,-774.9 75.2,-779.85 69.4,-785.39 61.28,-794.98 54.9,-805.41 50.22,-816.77 47.2,-829.13 46.27,-836.68 46.3,-846.09 47.25,-857.56 49.41,-867.86 52.98,-877.56
  text "JLCJLCJLCJLC" at 284.93,1080.44 h40
  text "-" at 364,596.49 h35 r180
  text "+" at 644.83,556 h35 r90
  text "Time-Counter  Rev v1" at -35,-985 h60
  text "© 2026 Csaba Zsigmond" at -80,-1053.73 h60
  text "CERN-OHL-P v2" at 15,-1119.33 h60
Bottom Overlay:
  text "2026. 10. 23.  21:43:03" at 685,-635 h150
Mechanical 1:
  the board outline again, w3.94
Bottom Component Center:
  lines w3.94: -605,-570.87 -605,255.91 610.24,255.91 610.24,-570.87 -605,-570.87
LED OUTLINE:
  lines w10: 692,-315 -708,-315 -708,1010 692,1010 ; 692,-315 692,1010 ; 692,-315 692,1010